# Altium PCB Kasli-DIOT.PCBDOC (part 11 of 23)
Units mm, origin at the board's own origin, x right, y up, seen from the top; angles counter-clockwise.
Board outline 222.9 x 100 mm, 10 copper layers (TopLayer, Layer 2, Layer 3, Layer 4, Layer 5, Layer 6, Layer 7, layer 8, Layer 9, BottomLayer), stack 1.564 mm thick; 977 components, 900 nets, 4676 pads, 2725 vias.
Unrouted connection lines stored in the file: 17.
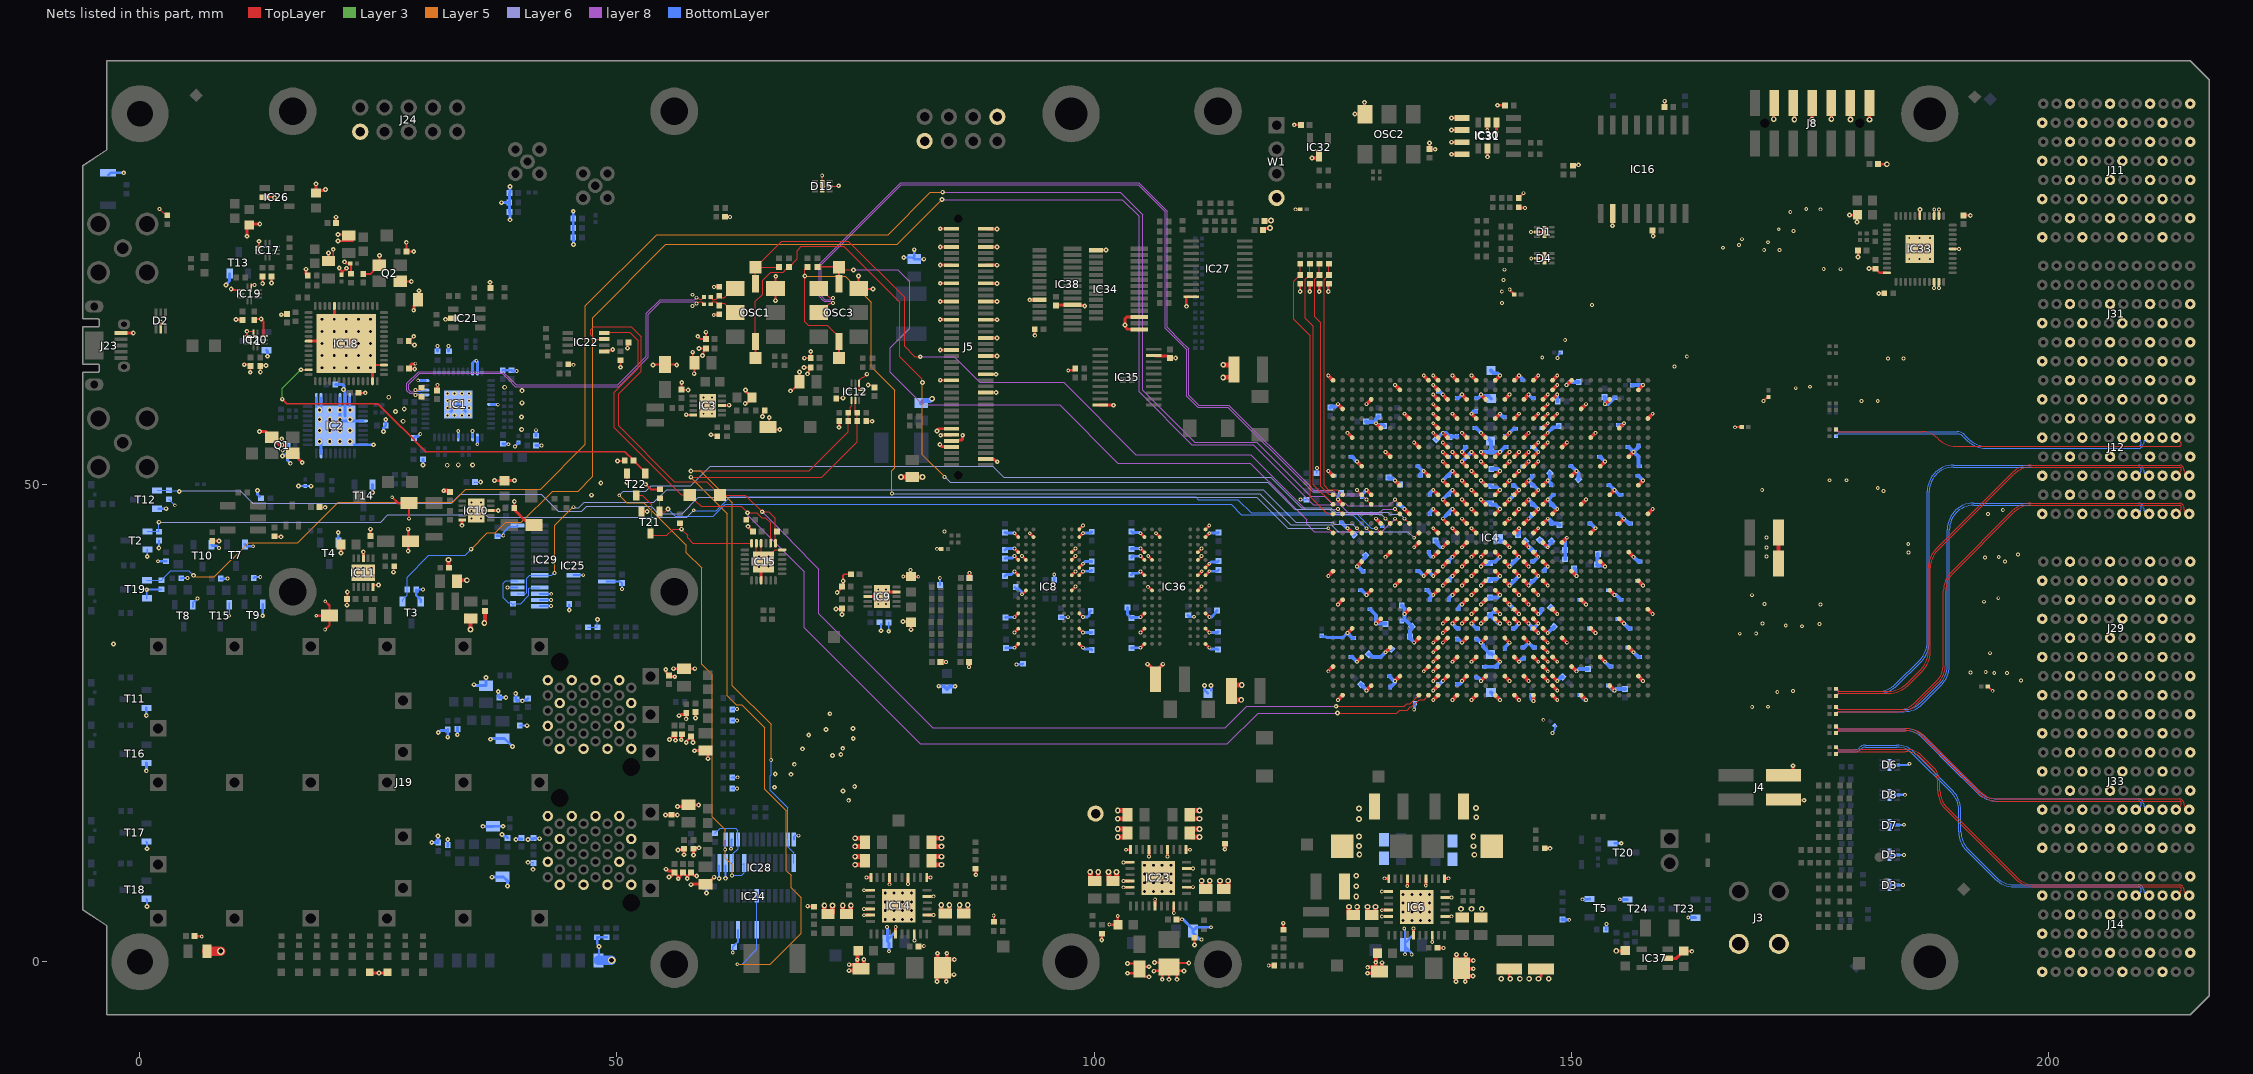
[diagram p17: the nets of this part, all layers, seen from the top]

## Via types
v1: diameter 0.4, hole 0.2, TopLayer to BottomLayer, tented both sides, 1723 vias
v2: diameter 0.5, hole 0.2, TopLayer to BottomLayer, tented both sides, 524 vias
v3: diameter 0.6, hole 0.3, TopLayer to BottomLayer, tented both sides, 172 vias
v4: diameter 0.6, hole 0.3, TopLayer to BottomLayer, 113 vias
v5: diameter 0.5, hole 0.2, TopLayer to BottomLayer, 107 vias
v6: diameter 0.4, hole 0.2, TopLayer to BottomLayer, 67 vias
v7: diameter 0.5, hole 0.25, TopLayer to BottomLayer, tented both sides, 12 vias
v8: diameter 0.8, hole 0.5, TopLayer to BottomLayer, tented both sides, 7 vias

## Nets (pads, with @x,y where several pads share a name; then routed paths per layer and width w, separated by ;. In a path a pad name is that pad's centre, name@x,y a point inside that pad or via, vN(x,y) a via of type N, cw(c..) or ccw(c..) an arc to the next point about the centre after c; other vN are vias at no path point) (continued)
GND: (continued)
  BottomLayer w0.25: R70.2@48.061,0.15 48.11,0.199 v2(48.11,1.591) 48.11,1.693 47.913,1.89 R223.1@47.913,2.585 R222.1@48.913,2.585 ; v1(132.523,3.486) 132.523,3.445 132.604,3.365 132.604,1.95 133.504,2.85 v1(133.504,3.485) ; v1(132.613,0.787) 132.613,1.766 C27.1@132.604,1.775 132.604,1.6 133.268,0.935 133.268,0.8 v1(133.297,0.771) ; T20.2@154.603,12.425 154.615,12.412 155.248,12.412 v2(155.261,12.425)
  BottomLayer w0.254: SW1.2@-3.348,82.427 -3.075,82.7 v5(-1.702,82.7) ; v1(1.9,41.988) 1.908,41.98 R308.2@2.747,41.98 2.76,41.967 R308.2@2.754,41.967 ; T12.2@1.982,47.498 v5(2.747,47.498) ; R306.2@4.342,40.204 4.372,40.235 v1(4.994,40.235) ; T10.2@7.504,43.7 7.571,43.633 8.036,43.633 v1(8.281,43.387) ; R310.2@8.456,40.175 v1(9.167,40.175) ; T7.2@11,43.756 T7.2@11.011,43.767 11.011,43.76 11.209,43.562 v1(11.866,43.562) ; R307.2@11.932,40.235 12.032,40.334 v1(12.613,40.334) ; v2(12.861,36.275) T9.2@12.861,37.463 ; v2(20.779,44.997) 20.794,44.982 T4.2@20.794,43.975 ; R45.1@28.944,39.003 R45.1@29.107,38.84 ; R45.1@28.944,39.023 28.944,38.429 29.24,38.133 29.251,38.133 29.424,37.96 T3.2@29.424,37.76 ; R256.2@37.416,44.675 37.444,44.647 38.058,44.647 v1(38.086,44.675) ; v2(80.061,73.824) 80.987,73.824 C423.1@81.161,73.65 ; v2(81.161,74.65) C423.1@81.161,73.65 ; v2(82.161,73.65) C423.1@81.161,73.65 ; v1(91.861,31.175) 91.888,31.202 92.509,31.202 R125.2@92.536,31.23 ; v1(95.833,40.59) 95.835,40.589 95.835,40.001 C471.1@95.836,40 ; R99.1@96.536,36.13 97.231,36.13 97.236,36.125 v1(97.286,36.125) v1@97.311,36.1 ; v5(111.577,28.959) 111.588,28.948 111.588,28.473 C50.1@111.936,28.125 ; C50.1@112.272,28.482 v5@112.272,28.957 ; C483.1@132.257,35.738 132.736,35.738 132.818,35.657 ; D3.7@183.386,8.05 D3.2@184.146,8.05 184.159,8.037 v1(184.784,8.037) ; D5.2@184.146,11.209 184.161,11.194 v1(184.919,11.194) ; D7.2@184.146,14.341 184.892,14.341 v1(184.914,14.363) ; D6.2@184.146,20.632 185.305,20.632 185.447,20.774 v1@185.458,20.774 ; D8.2@184.163,17.504 v1(184.999,17.504)
  BottomLayer w0.3: T16.2@0.661,20.85 0.669,20.842 v2(0.669,20.02) ; T11.2@0.661,26.6 0.663,26.598 v2(0.663,25.824) ; v2(9.011,70.95) 9.061,71 9.061,71.025 9.387,71.351 9.387,72.101 T13.2@9.411,72.125 ; v2(12.322,49.395) 12.322,48.99 R154.2@12.537,48.775 ; T1.2@13.251,64.112 13.363,64 v2(13.363,63.474) ; v2(14.936,53.025) 15.061,53.15 C23.1@15.461,53.15 ; C23.1@15.561,53.15 C23.1@15.461,53.15 ; v2(15.761,52.25) 15.752,52.25 15.461,52.541 C23.1@15.461,53.15 ; IC2.37@18.483,58.199 IC2.19@18.483,59.099 ; IC2.8@18.983,53.299 IC2.37@18.983,54.699 ; IC2.37@18.983,57.699 IC2.20@18.983,59.099 ; R17.1@20.481,60.525 21.248,60.525 21.383,60.39 21.383,60.047 v2(21.321,59.985) 21.483,59.823 IC2.25@21.483,59.099 IC2.37@21.483,57.199 ; IC2.24@20.983,59.099 20.983,56.699 IC2.31@23.383,56.699 ; IC2.37@21.983,57.699 IC2.26@21.983,59.099 ; IC2.37@22.483,54.199 IC2.36@23.383,54.199 v2(24.487,54.199) ; v5(24.38,49.197) 24.383,49.2 24.383,50.022 T14.2@24.386,50.025 ; v2(25.511,55.575) 25.511,55.951 C24.1@25.759,56.199 v2(25.759,56.848) ; C191.1@28.736,54.9 28.896,55.06 29.121,55.06 v1(29.386,55.325) ; v1(29.161,60.95) 29.188,60.95 29.21,60.928 IC1.22@29.911,60.928 ; v2(29.653,52.071) 29.657,52.075 29.657,52.676 R243.1@29.661,52.68 ; v2(30.586,12.5) C267.1@31.261,12.5 31.248,12.512 31.248,13.163 v2(31.236,13.175) ; v1(31.171,64.552) 31.178,64.545 31.178,64.028 R8.2@31.186,64.02 ; v2(31.261,24.05) 31.315,24.05 31.515,24.25 32.161,24.25 C178.1@32.261,24.35 v2(32.261,23.55) ; C266.1@32.261,12.15 C266.1@32.261,12.25 v2(32.261,12.825) ; R7.2@32.336,64.02 32.341,64.025 32.341,64.533 v1(32.346,64.538) ; IC1.45@32.611,57.678 v5(32.98,58.047) IC1.45@33.361,58.428 v5(33.742,58.047) IC1.45@34.111,57.678 ; v2(33.261,23.8) 33.274,23.813 C185.1@33.274,24.588 ; IC1.6@33.361,54.978 v1(33.361,55.65) ; IC1.3@34.861,54.978 v1(34.861,55.65) ; IC1.31@34.861,61.878 34.861,62.779 35.068,62.986 35.236,62.986 v1(35.255,63.005) 35.361,62.899 IC1.32@35.361,61.878 ; v2(35.011,29.05) 35.065,29.05 35.165,28.95 C179.1@36.261,28.95 v2(36.261,29.8) ; v1(35.361,54.25) IC1.2@35.361,54.978 ; v2(35.936,14.2) C268.1@37.011,14.2 37.019,14.208 v2(38.043,14.208) ; v2(36.736,23.325) 36.79,23.325 36.865,23.4 C184.1@38.011,23.4 38.211,23.4 v2(39.036,22.575) ; IC1.39@36.811,58.428 37.451,58.428 37.48,58.4 v1(37.507,58.4) ; v2(36.911,8.875) 37.986,8.875 C272.1@38.011,8.9 38.111,8.9 38.511,8.5 v2(38.511,7.95) ; v2(37.549,28.343) 37.587,28.304 37.587,27.774 37.663,27.698 38.347,27.698 v2(38.349,27.696) ; v2(37.886,79.575) R30.1@38.716,79.575 ; v2(37.943,13.333) 37.997,13.333 38.17,13.16 38.351,13.16 C269.1@38.511,13 ; C243.1@38.021,62.012 38.027,62.006 38.955,62.006 39.017,61.944 39.467,61.944 v1(39.486,61.925) ; C190.1@38.036,54.3 38.067,54.269 38.592,54.269 v1(38.611,54.25) ; v2(38.786,77.775) 38.786,78.524 C46.1@38.736,78.574 C47.1@38.736,80.575 38.786,80.625 v2(38.786,81.275) ; v1(39.311,54) 39.311,54.025 39.686,54.4 C242.1@39.686,54.425 ; v2(39.382,28.139) 39.42,28.1 39.42,27.459 39.487,27.392 40.038,27.392 v2(40.077,27.354) 40.115,27.392 40.221,27.392 40.269,27.44 40.526,27.44 C181.1@40.686,27.6 ; v2(39.393,12.833) 39.447,12.833 39.488,12.874 39.985,12.874 C270.1@40.011,12.9 ; v2(40.668,12.833) 40.701,12.867 41.228,12.867 41.307,12.946 41.842,12.946 v2(41.881,12.907) ; C241.1@41.496,54.142 41.504,54.133 42.078,54.133 v1(42.086,54.125) ; C239.1@41.496,55.142 41.503,55.149 41.503,55.718 v1(41.511,55.725) ; v2@44.993,37.08 v2@44.995,37.082 ; v2@44.995,36.882 C305.1@44.995,37.414 ; v2(45.411,78.675) C44.1@45.411,77.925 C43.1@45.411,75.924 45.423,75.912 45.423,75.213 v2(45.436,75.2) ; v1(78.31,3.666) 78.31,3.638 78.348,3.6 C22.1@78.348,2.128 ; v1(78.523,1.108) 78.523,1.953 C22.1@78.348,2.128 ; v1(79.211,3.65) 79.192,3.631 79.192,3.146 78.348,2.303 C22.1@78.348,2.128 ; C462.1@90.685,42.273 90.732,42.32 91.445,42.32 91.647,42.522 v1(91.661,42.522) ; C467.1@90.685,43.181 90.817,43.313 91.651,43.313 v1(91.661,43.322) ; C460.1@90.685,45.015 90.769,44.932 91.651,44.932 v1(91.661,44.922) ; C164.1@90.686,40.45 90.846,40.61 91.335,40.61 91.647,40.922 v1(91.661,40.922) ; C454.1@90.736,36.075 90.776,36.115 91.654,36.115 v1(91.664,36.125) ; C452.1@90.761,32.875 90.801,32.915 91.654,32.915 v1(91.664,32.925) ; C466.1@91.711,39.225 91.871,39.065 92.122,39.065 92.454,38.733 92.454,38.548 v1@92.464,38.538 ; v1(98.858,40.925) 98.868,40.935 99.646,40.935 C465.1@99.761,41.05 ; v1(98.858,41.725) 99.083,41.95 C456.1@99.761,41.95 ; v1(98.858,44.925) 98.868,44.935 99.621,44.935 C171.1@99.761,45.075 ; v1(98.861,32.928) 98.875,32.928 99.001,32.801 99.66,32.801 C455.1@99.761,32.7 ; v1(98.861,34.528) 98.871,34.537 99.748,34.537 C453.1@99.761,34.55 ; v1(98.861,36.128) 98.871,36.137 99.325,36.137 99.501,36.313 99.501,36.615 C169.1@99.661,36.775 ; C469.1@103.511,37.15 103.511,36.425 C457.1@103.911,36.025 103.993,36.107 104.857,36.107 104.875,36.125 v1(104.889,36.125) ; C166.1@103.915,40.575 104.065,40.725 104.675,40.725 104.872,40.922 v1(104.886,40.922) ; C463.1@103.915,42.385 104.043,42.513 104.876,42.513 v1(104.886,42.522) ; C470.1@103.915,43.282 103.946,43.313 104.876,43.313 v1(104.886,43.322) ; C461.1@103.915,45.111 104.026,45 104.794,45 104.872,44.922 v1(104.886,44.922) ; C459.1@103.936,32.875 103.976,32.915 104.879,32.915 v1(104.889,32.925) ; v1(109.23,4.453) 109.25,4.434 109.356,4.434 110.39,3.4 C40.1@110.39,3.225 ; R100.1@109.861,36.305 110.001,36.165 v1(110.496,36.165) ; v1(111.261,2.351) 111.242,2.37 111.07,2.37 110.39,3.05 C40.1@110.39,3.225 ; v1(112.077,40.94) 112.083,40.935 112.896,40.935 C464.1@113.036,41.075 ; v1(112.083,41.725) 112.097,41.725 112.276,41.904 112.915,41.904 C458.1@113.036,42.025 ; v1(112.083,44.925) 112.093,44.935 112.971,44.935 C170.1@113.036,45 ; v1(112.086,32.928) 112.1,32.928 112.226,32.801 112.936,32.801 C468.1@112.986,32.751 ; v1(112.086,34.528) 112.096,34.537 112.926,34.537 C451.1@112.986,34.598 ; v1(112.086,36.128) 112.096,36.137 112.335,36.137 112.751,36.553 112.751,36.665 C165.1@112.911,36.825 ; v1@112.245,3.625 110.765,3.625 110.39,3.25 C40.1@110.39,3.225 ; C484.1@123.861,34.175 123.861,34.15 123.936,34.075 124.3,34.075 124.375,34 126.092,34 126.542,34.45 v1(126.561,34.45) ; v1(125.561,48.45) 125.561,48.8 125.891,49.13 R9.1@125.891,49.15 ; v1(133.561,26.45) 133.611,26.5 133.611,27.05 C317.1@133.661,27.1 ; v1(151.211,6.55) 151.586,6.55 T5.2@151.961,6.575 ; R261.1@153.656,3.375 153.692,3.411 153.692,3.931 v1(153.711,3.95) ; v1(155.111,6.55) 155.536,6.55 T24.2@155.911,6.525 ; v1(162.284,4.634) 162.288,4.629 163.057,4.629 T23.2@163.061,4.625
  BottomLayer w0.4: v2(83.729,28.892) 83.746,28.875 84.305,28.875 C173.1@84.58,28.6 84.844,28.864 85.43,28.864 v2(85.449,28.883) ; C474.1@83.927,31.431 83.933,31.425 v1(84.486,31.425) ; v1(86.911,30.9) 86.911,31.437 C478.1@86.915,31.441 ; C476.1@86.936,40.227 v1(86.936,40.775) ; v1(124.561,51.45) 125.061,50.95 C310.1@125.186,50.95 ; C31.1@124.761,58.1 124.871,58.21 125.321,58.21 v1(125.561,58.45) ; C309.1@125.911,46.05 125.936,46.05 126.536,45.45 v1(126.561,45.45) C92.1@127.243,44.768 ; v1(126.561,34.45) 127.061,33.95 C155.1@127.211,33.95 ; C318.1@126.911,31.95 127.061,31.95 v1(127.561,31.45) ; C82.1@126.911,52.95 127.032,52.95 127.532,52.45 v1(127.561,52.45) ; v1(127.557,41.453) 127.667,41.453 128.192,40.928 C482.1@128.217,40.928 ; v1@127.561,41.45 128.036,41.925 128.036,42.006 128.468,42.438 C163.1@128.468,42.593 ; C156.1@127.911,38.95 128.061,38.95 v1(128.561,38.45) ; C96.1@127.979,29.082 128.561,28.5 v1(128.561,28.45) ; C80.1@128.061,48.775 128.061,48.95 v1(128.561,49.45) ; C37.1@128.511,56.65 128.571,56.59 129.421,56.59 v1(129.561,56.45) ; C168.1@128.779,32.232 128.935,32.232 129.217,31.95 130.061,31.95 130.793,32.682 130.901,32.682 131.012,32.793 C109.1@131.168,32.793 ; C154.1@128.911,36.95 128.936,36.95 129.561,36.325 v1(129.561,35.45) 130.537,35.45 C481.1@130.561,35.426 ; v1(129.561,46.45) 130.186,45.825 130.186,45.65 C62.1@130.211,45.65 ; C79.1@129.836,57.175 129.561,56.9 v1(129.561,56.45) ; C39.1@130.411,56.15 130.301,56.26 129.751,56.26 v1(129.561,56.45) ; C35.1@130.873,50.775 130.983,50.665 131.346,50.665 v1(131.561,50.45) 131.849,50.162 131.983,50.162 C57.1@132.093,50.052 ; C316.1@130.911,29.925 130.986,29.925 131.461,29.45 v1(131.561,29.45) 131.561,29.25 131.086,28.775 131.061,28.775 C315.1@131.061,28.75 ; C68.1@131.911,47.95 132.031,47.95 132.531,47.45 v1(132.561,47.45) ; C480.1@132.264,37.361 132.264,37.351 132.561,37.054 v1(132.561,36.45) 132.561,35.914 132.736,35.738 ; 132.818,35.657 C86.1@133.343,35.132 133.343,34.976 133.111,34.744 133.111,33.925 133.561,33.475 v1(133.561,33.45) ; C153.1@133.911,40.95 134.061,40.95 v1(134.561,40.45) ; C138.1@133.911,51.95 133.936,51.95 134.417,51.469 134.542,51.469 v1(134.561,51.45) ; C125.1@134.211,50.95 C125.1@134.236,50.95 134.236,51.162 134.362,51.289 ; C485.1@134.869,38.965 134.894,38.965 135.409,38.45 v1@135.515,38.45 ; C118.1@135.111,42.95 135.136,42.95 135.136,42.684 135.37,42.45 v1(135.561,42.45) ; C98.1@135.211,37.971 135.211,38.146 v1@135.515,38.45 ; C119.1@135.211,40.95 135.236,40.95 135.236,40.775 v1(135.561,40.45) ; C117.1@135.211,46.95 135.236,46.95 135.236,47.117 135.25,47.131 135.25,47.164 135.536,47.45 v1(135.561,47.45) ; C55.1@135.211,48.95 135.236,48.95 135.236,49.125 v1(135.561,49.45) ; v1(135.561,28.45) v1(136.561,29.45) ; v1(135.561,38.45) v1@135.515,38.45 ; v1(135.561,60.45) 136.061,59.95 C334.1@136.061,59.8 ; v1(135.561,60.45) v1(136.561,59.45) ; C357.1@135.811,44.15 135.921,44.04 135.921,43.837 136.308,43.45 v1(136.561,43.45) ; C93.1@135.879,54.768 v1(136.561,55.45) 136.886,55.45 137.311,55.025 137.361,55.075 138.061,55.075 C344.1@138.061,55.1 ; v1(136.561,39.45) v1(137.561,40.45) ; v1(136.561,41.45) C377.1@137.086,41.975 ; v1(136.561,46.45) 137.049,46.938 137.049,46.962 137.537,47.45 v1(137.561,47.45) ; v1(136.561,48.45) v1(137.561,49.45) ; v1(136.561,50.45) v1(137.561,51.45) ; v1(136.561,53.45) 137.073,52.938 C373.1@137.211,52.938 ; C379.1@137.211,37.962 137.211,38.137 137.524,38.45 v1(137.561,38.45) ; C377.1@137.211,41.975 C377.1@137.086,41.975 ; v1(137.561,35.45) 138.061,34.95 C330.1@138.211,34.95 ; v1(137.561,42.45) 137.537,42.45 137.386,42.299 137.386,42.275 C377.1@137.086,41.975 ; C114.1@138.061,29.1 138.061,29.125 138.327,29.125 138.561,29.359 v1(138.561,29.45) ; C331.1@138.061,33.8 138.061,33.775 138.236,33.775 138.386,33.625 v1(138.561,33.45) ; C333.1@138.061,59.1 138.061,59.125 138.236,59.125 v1(138.561,59.45) ; C102.1@138.211,36.95 138.236,36.95 138.236,37.216 138.47,37.45 v1(138.561,37.45) ; v1(138.561,52.45) v1(139.561,53.45) ; v1(138.561,53.45) 138.886,53.775 138.886,53.95 C340.1@138.911,53.95 ; v1(138.561,55.45) 138.586,55.45 139.086,54.95 C345.1@139.111,54.95 ; v1(139.561,35.45) 140.061,34.95 C327.1@140.211,34.95 ; v1(139.561,57.45) 139.786,57.675 140.061,57.675 C337.1@140.061,57.7 ; C350.1@139.911,55.95 140.061,55.95 v1(140.561,55.45) 141.136,54.875 141.286,54.875 C332.1@141.561,54.6 141.598,54.563 141.598,53.538 C361.1@141.636,53.5 ; C115.1@140.061,29.8 140.061,29.775 140.327,29.775 140.561,29.541 v1(140.561,29.45) ; C336.1@140.061,59.1 140.061,59.125 140.315,59.125 140.561,59.371 v1(140.561,59.45) 140.711,59.3 141.361,59.3 C319.1@141.636,59.025 ; C322.1@140.088,33.8 140.088,33.775 140.263,33.775 v1@140.574,33.463 ; v1(140.561,33.45) 140.762,33.249 140.762,33.021 141.288,32.496 141.288,32.475 141.439,32.324 141.687,32.324 v1(142.561,31.45) 142.236,31.125 142.236,30.95 C329.1@142.211,30.95 142.186,30.95 142.161,30.925 C112.1@140.911,30.925 ; v1(140.561,35.45) 140.611,35.45 C111.1@141.511,36.35 ; v1(140.561,37.45) 141.176,38.065 141.401,38.065 C110.1@141.511,38.175 142.286,38.175 v1(142.561,38.45) ; v1(140.561,39.45) 141.001,39.89 141.401,39.89 C134.1@141.511,40 141.621,40.11 142.221,40.11 v1(142.561,40.45) ; v1(140.561,41.45) 140.826,41.715 141.401,41.715 C352.1@141.511,41.825 141.621,41.935 142.046,41.935 v1(142.561,42.45) ; v1(140.561,48.45) 140.876,48.135 141.526,48.135 C356.1@141.636,48.025 141.746,47.915 142.096,47.915 v1(142.561,47.45) ; v1(140.561,50.45) 141.051,49.96 141.526,49.96 C135.1@141.636,49.85 141.746,49.74 142.271,49.74 v1(142.561,49.45) ; v1(140.561,53.45) v1(142.561,53.45) 143.061,53.95 C341.1@143.211,53.95 ; C321.1@141.611,61.975 141.886,61.7 142.311,61.7 v1(142.561,61.45) ; C101.1@141.613,28.25 141.888,27.975 142.036,27.975 v1(142.561,27.45) ; C355.1@141.636,51.65 142.361,51.65 v1(142.561,51.45) ; L5.1@142.361,44.35 142.661,44.05 142.961,44.05 v1(143.561,43.45) ; v1(142.561,35.45) 142.411,35.45 C111.1@141.511,36.35 ; v1(142.561,36.45) 142.364,36.647 141.952,36.647 141.945,36.64 141.801,36.64 C111.1@141.511,36.35 ; v1(142.561,57.45) 142.886,57.125 143.061,57.125 C335.1@143.061,57.1 ; C324.1@143.061,32.8 143.061,32.95 v1(143.561,33.45) ; C349.1@143.061,55.125 143.235,55.125 v1@143.474,55.364 ; v1(143.561,37.45) v1(144.561,36.45) 144.061,36.95 C106.1@143.911,36.95 ; v1(143.561,39.45) v1(144.561,40.45) ; v1(143.561,41.45) v1(144.561,42.45) ; v1(143.561,48.45) v1(144.561,49.45) 144.261,49.75 144.086,49.925 C376.1@143.911,49.925 ; v1@143.665,55.554 143.992,55.881 C343.1@144.208,55.881 ; C326.1@143.911,34.95 144.061,34.95 v1(144.561,35.45) ; C143.1@144.436,44.75 144.546,44.86 144.546,45.435 v1(144.561,45.45) ; v1(144.561,31.45) 144.561,31.453 144.795,31.687 144.827,31.687 144.915,31.775 145.061,31.775 C97.1@145.061,31.8 ; v1(144.561,61.45) 144.886,61.125 144.886,60.95 C348.1@144.911,60.95 ; C323.1@144.911,32.95 145.061,32.95 v1(145.561,33.45) 146.061,32.95 C113.1@146.211,32.95 ; C375.1@144.911,51.925 145.036,51.925 v1(145.561,52.45) ; C145.1@145.218,44.107 145.218,43.951 145.561,43.608 v1(145.561,43.45) ; v1(145.561,35.45) C325.1@146.061,34.95 ; v1(145.561,39.45) v1(146.561,40.45) ; v1(145.561,46.45) 145.585,46.45 145.736,46.601 145.736,46.625 v1(146.561,47.45) ; v1(145.561,48.45) 145.585,48.45 145.761,48.274 145.761,48.25 v1(146.561,47.45) ; v1(145.561,59.45) 145.886,59.125 146.061,59.125 C347.1@146.061,59.1 ; C328.1@145.861,27.95 145.861,27.55 v1(146.061,27.35) ; C325.1@145.911,34.95 C325.1@146.061,34.95 ; C122.1@145.911,41.95 146.061,41.95 v1(146.561,42.45) v1(145.561,43.45) ; C342.1@145.911,53.95 146.061,53.95 v1(146.561,53.45) ; C99.1@145.936,47.95 146.061,47.95 146.286,47.725 v1(146.561,47.45) ; C354.1@145.936,50.95 145.911,50.95 145.911,50.776 145.585,50.45 v1(145.561,50.45) v1(146.561,49.45) ; C369.1@146.186,42.975 146.161,42.975 145.686,43.45 v1(145.561,43.45) ; v1(146.561,34.45) C325.1@146.061,34.95 ; v1(146.561,35.45) C325.1@146.061,34.95 ; v1(146.561,36.45) 146.652,36.45 146.886,36.684 146.886,36.925 C380.1@146.911,36.925 ; C152.1@146.718,44.232 147.5,43.45 v1(147.561,43.45) 147.561,43.544 147.968,43.951 C151.1@147.968,44.107 ; C338.1@146.911,55.95 147.061,55.95 v1(147.561,56.45) ; C368.1@147.211,40.95 147.236,40.95 147.236,41.125 v1(147.561,41.45) ; v1(147.561,34.45) 148.213,35.102 C66.1@148.213,35.117 ; v1(147.561,46.45) 147.736,46.275 147.736,46.386 C370.1@148.05,46.072 ; v1(147.561,55.45) 148.151,56.04 148.601,56.04 C58.1@148.711,56.15 ; C124.1@147.779,51.232 147.779,50.668 v1(147.561,50.45) 147.736,50.275 147.886,50.125 147.886,49.95 C372.1@147.911,49.95 ; C123.1@147.879,37.132 v1(148.561,36.45) ; C370.1@147.911,45.95 148.611,45.95 C314.1@148.786,45.775 ; C371.1@147.911,47.95 147.936,47.95 148.436,47.45 v1(148.561,47.45) v1(147.561,48.45) 147.636,48.45 148.136,48.95 C148.1@148.161,48.95 ; v1(148.561,29.45) 148.974,29.863 C94.1@149.124,29.863 ; v1(148.561,59.45) 148.561,58.8 C85.1@148.611,58.75 ; R32.1@149.111,4.435 149.146,4.4 v1(149.811,4.4) ; C158.1@149.386,42.2 C313.1@149.386,43.175 149.386,44.275 v1(149.561,44.45) ; v1(149.511,60.475) 149.819,60.783 C429.1@150.811,60.783 ; C311.1@149.961,51.95 150.061,51.95 v1(150.561,51.45) 150.779,51.232 C67.1@150.779,50.568 ; C240.1@150.36,41.221 150.47,41.111 150.47,40.541 v1(150.561,40.45) ; v1(150.561,30.45) 150.811,30.7 C34.1@151.761,30.7 ; C432.1@150.911,27.975 150.936,27.975 151.461,27.45 v1(151.561,27.45) ; C76.1@150.911,37.95 151.061,37.95 v1(151.561,37.45) ; C140.1@151.899,34.95 152.061,34.95 v1(152.561,34.45) ; C127.1@151.961,45.95 152.061,45.95 v1(152.561,45.45) ; C78.1@152.811,42.75 152.761,42.7 152.761,41.675 C59.1@152.711,41.625 152.821,41.515 153.496,41.515 v1(153.561,41.45) ; C64.1@152.961,52.95 153.036,52.95 153.536,52.45 v1(153.561,52.45) ; C428.1@153.496,59.192 153.561,59.127 v1(153.561,58.45) 153.887,58.45 154.575,59.138 C433.1@154.6,59.138 ; v1(153.561,31.45) 154.061,30.95 C60.1@154.211,30.95 ; C147.1@153.911,28.95 153.936,28.95 154.436,28.45 v1(154.561,28.45) 154.711,28.6 C33.1@155.661,28.6 ; C83.1@153.911,38.95 154.061,38.95 v1(154.561,38.45) 154.736,38.45 155.236,37.95 C128.1@155.261,37.95 ; C89.1@153.961,49.95 154.061,49.95 v1(154.561,49.45) 155.061,48.95 C87.1@155.261,48.95 ; C308.1@154.911,35.937 155.074,35.937 v1(155.561,35.45) 156.061,34.95 C139.1@156.196,34.95 ; C69.1@154.911,46.95 155.061,46.95 v1(155.561,46.45) 156.061,45.95 C88.1@156.261,45.95 ; C431.1@154.967,56.26 154.992,56.285 155.396,56.285 v1(155.561,56.45) ; C146.1@155.911,32.95 156.061,32.95 v1(156.561,32.45) 157.061,31.95 C61.1@157.211,31.95 ; C90.1@155.961,53.95 156.057,53.95 v1@156.557,53.45 ; C430.1@156.411,60.45 v1(157.561,60.45) ; v1(156.561,42.45) 157.061,41.95 C136.1@157.261,41.95 ; C126.1@156.923,39.95 157.061,39.95 v1(157.561,39.45) ; C149.1@156.961,50.95 157.061,50.95 v1(157.561,50.45) ; C81.1@157.061,54.1 157.061,53.95 v1(156.561,53.45) 157.061,52.95 157.061,52.075 157.186,51.95 C75.1@157.211,51.95
  BottomLayer w0.5: C425.1@81.886,58.55 82.161,58.825 82.809,58.825 83.009,59.025 v4(83.036,59.025)
  BottomLayer w1: R70.2@48.061,0.15 v8@49.405,0.15
  other v1: 112.272,3.625 185.472,20.759 147.097,25.368 168.989,26.72 170.635,26.735 171.623,28.291 173.261,28.375 197.161,29.5 194.361,30.275 195.686,30.275 191.881,30.311 193.464,30.369 193.911,32.35 167.69,34.395 169.411,34.4 174.212,35.177 172.512,35.237 176.036,35.425 170.086,35.45 176.136,37.45 170.286,37.5 193.302,37.747 194.789,38.117 168.956,38.43 195.498,41.958 193.395,42.366 194.835,42.436 170.486,42.49 196.841,42.707 185.384,42.896 170.486,43.427 185.348,43.8 170.486,44.49 193.713,46.925 195.261,47.362 182.761,49.337 170.036,49.45 182.155,49.657 177.086,50.475 178.86,50.48 14.969,53.575 180.441,58.774 182.149,58.774 173.556,60.13 175.061,60.275 160.836,62.4 183.223,63.241 184.861,63.25 146.987,63.339 162.136,63.45 149.386,65.175 57.909,68.749 152.211,68.85 142.777,69.044 57.909,69.921 142.746,70.262 142.936,71.475 143.036,72.55 178.261,72.6 176.486,72.625 170.246,74.619 171.844,74.615 165.936,74.85 167.611,75.125 170.636,75.424 167.926,75.744 173.311,76.6 171.779,76.785 172.986,78.6 176.161,78.875 174.655,78.902
  other v2: 137.936,-2.075 138.911,-2.075 74.286,16.925 73.7,17.906 66.499,18.298 74.912,18.384 68.25,19.652 66.586,19.7 68.586,20.7 72.596,21.619 73.461,21.725 69.436,22.325 73.661,22.375 74.76,23.411 70.098,23.787 71.897,24.345 74.749,24.456 72.311,26 -2.789,33.325 44.993,36.88 47.325,48.913 48.304,50.176 14.894,54.167 49.557,64.18 109.687,68.704 150.786,83.54
  other v3: 142.686,-1.775 143.636,-1.775 144.636,-1.775 145.611,-1.775 147.661,-1.775 138.461,5.55 139.561,5.55 140.636,5.55 127.492,6.842 127.492,7.917 127.492,9.017 139.866,11.226 127.811,11.25 139.79,12.125 127.786,12.15 127.786,13.125 139.765,13.125 127.786,14.971 140.061,15.149 127.786,16.071 140.036,16.124
  other v4: 132.399,4.317 133.315,4.317 134.232,4.317 135.149,4.317 78.111,4.45 79.028,4.45 79.944,4.45 80.861,4.45 132.399,5.234 133.315,5.234 134.232,5.234 135.149,5.234 78.111,5.367 79.028,5.367 79.944,5.367 80.861,5.367 132.399,6.15 133.315,6.15 134.232,6.15 135.149,6.15 78.111,6.283 79.028,6.283 79.944,6.283 80.861,6.283 132.399,7.067 133.315,7.067 134.232,7.067 135.149,7.067 78.111,7.2 79.028,7.2 79.944,7.2 80.861,7.2 105.311,7.375 106.228,7.375 107.144,7.375 108.061,7.375 105.311,8.292 106.228,8.292 107.144,8.292 108.061,8.292 105.311,9.208 106.228,9.208 107.144,9.208 108.061,9.208 105.311,10.125 106.228,10.125 107.144,10.125 108.061,10.125 18.832,54.548 19.89,54.548 20.949,54.548 22.007,54.548 18.832,55.691 19.89,55.691 20.949,55.691 22.007,55.691 18.832,56.834 19.89,56.834 20.949,56.834 22.007,56.834 18.832,57.85 19.89,57.85 20.949,57.85 22.007,57.85 19.086,62.268 20.356,62.268 21.626,62.268 22.896,62.268 24.166,62.268 19.086,63.538 20.356,63.538 21.626,63.538 22.896,63.538 24.166,63.538 19.086,64.808 20.356,64.808 21.626,64.808 22.896,64.808 24.166,64.808 19.086,66.078 20.356,66.078 21.626,66.078 22.896,66.078 24.166,66.078 19.086,67.348 20.356,67.348 21.626,67.348 22.896,67.348 24.166,67.348
  other v5: 112.261,28.968 77.38,37.525 78.205,37.525 78.18,38.275 77.38,39.025 78.18,39.025 22.561,40.375 23.361,40.375 24.261,40.375 22.561,41.275 23.361,41.275 24.261,41.275 64.905,41.403 65.88,41.428 64.905,42.503 65.88,42.503 34.761,46.45 35.761,46.45 34.761,47.25 35.761,47.25 34.761,48.15 35.761,48.15 32.218,57.285 32.98,57.285 33.742,57.285 34.504,57.285 59.061,57.45 59.961,57.45 32.218,58.047 34.504,58.047 59.061,58.35 59.961,58.35 32.218,58.809 32.98,58.809 33.742,58.809 34.504,58.809 59.061,59.15 59.961,59.15 32.218,59.571 32.98,59.571 33.742,59.571 34.504,59.571
  other v6: 84.332,45.119 185.449,73.662 186.549,73.662 187.649,73.662 186.549,74.737 185.449,74.762 187.649,74.762 185.449,75.862 186.549,75.862 187.649,75.862
  other v7: 32.218,52.051 33.349,52.083 34.861,52.071 40.003,55.796 27.579,56.653 39.992,57.102 26.787,57.682 27.712,57.947 40.043,58.589 26.085,59.169 40.043,59.875 38.218,60.236
  other v8: 49.431,0.176
GPIO_INT0: IC4.U4 IC25.20 IC29.1 | length 98.8
  TopLayer w0.095: v1(127.561,45.45) IC4.U4@128.061,44.95
  Layer 5 w0.125: v1(43.461,40.75) 43.461,45.75 45.256,47.545 45.259,47.545 45.369,47.655 v1(45.444,47.655)
  Layer 6 w0.095: v1(45.444,47.655) 45.499,47.6 45.986,47.6 46.549,48.163 53.85,48.163 55.192,49.505 117.719,49.505 121.074,46.15 121.151,46.073 125.009,46.073 125.205,45.877 127.134,45.877 v1(127.561,45.45)
  BottomLayer w0.125: IC29.1@39.558,38.575 40.404,38.575 40.537,38.707 40.537,40.226 40.836,40.525 IC25.20@41.908,40.525 43.162,40.525 43.387,40.75 v1(43.461,40.75)
GPIO_INT1: IC4.T9 IC24.20 IC28.1 | length 136
  TopLayer w0.095: v1(132.561,46.45) IC4.T9@133.061,45.95
  Layer 5 w0.1: v1(50.236,48.9) 51.032,48.104 52.823,48.104 57.253,43.674 57.253,42.9 58.861,41.293 58.861,31.167 59.961,30.067 59.961,15.225 61.341,13.845 v1(61.341,11.779) 61.341,10.87 62.061,10.15 v1(62.061,9.05)
  Layer 6 w0.095: v1(50.236,48.9) 50.676,49.34 53.034,49.34 53.599,49.906 57.742,49.906 59.761,51.925 89.411,51.925 90.536,50.8 118.536,50.8 121.72,47.616 124.839,47.616 125.353,47.103 130.835,47.103 131.03,46.908 132.103,46.908 v1(132.561,46.45)
  BottomLayer w0.1: v1(62.061,9.05) 63.061,9.05 63.336,9.325 IC24.20@63.336,10.35 IC24.20@63.2,10.214
  BottomLayer w0.125: IC28.1@61.341,12.78 IC28.1@61.386,12.825
  BottomLayer w0.2: v1(61.341,11.779) IC28.1@61.341,12.78
GPIO_RESET0: IC25.18 IC29.3 R132.2 | length 8.4
  BottomLayer w0.125: R132.2@39.106,37.386 38.878,37.614 38.619,37.614 38.081,38.152 38.081,39.666 38.346,39.931 39.502,39.931 IC29.3@39.558,39.875 ; R132.2@39.116,37.55 39.899,37.55 40.762,38.413 40.762,39.131 40.835,39.205 41.887,39.205 IC25.18@41.908,39.225
GPIO_RESET1: IC24.18 IC28.3 R131.2 | length 6.4
  BottomLayer w0.1: IC24.18@62.036,10.35 62.177,10.491 62.177,11.366 62.686,11.875 IC28.3@62.686,12.825
  BottomLayer w0.125: R131.2@60.263,13.499 60.491,13.726 60.571,13.726 60.833,13.988 62.438,13.988 62.671,13.754 62.671,12.84 IC28.3@62.686,12.825
Helper_DCXO_N: IC4.N4 OSC3.5 | length 91.9
  TopLayer w0.095: OSC3.5@71.161,68.05 71.361,68.05 72.323,69.012 72.578,69.012 v1(72.636,69.07) ; v1(127.561,49.45) IC4.N4@128.061,48.95
  layer 8 w0.075: v1(72.636,69.07) 72.579,69.07 72.43,69.219 71.706,69.219 71.593,69.332 71.184,69.741 71.184,73.134 79.722,81.672 104.707,81.672 107.686,78.693 107.686,66.5 109.061,65.125 109.929,64.257 109.929,59.38 110.954,58.355 114.121,58.355 122.386,50.09 123.022,49.454 124.964,49.454 125.166,49.252 125.354,49.064 127.797,49.064 127.841,49.108 127.841,49.17 v1(127.561,49.45)
Helper_DCXO_OE: IC12.9 IC24.7 IC28.19 R245.1 R247.2 | length 92.6
  TopLayer w0.125: v2(57.736,50.799) 71.478,50.799 75.166,54.488 R247.2@75.166,56.675 R245.1@75.166,57.55 ; R245.1@74.986,57.55 IC12.9@74.986,58.85
  Layer 5 w0.125: v2(57.736,50.799) 61.561,46.974 61.561,27.876 62.485,26.952 63.059,26.952 65.495,24.516 65.495,18.083 67.761,15.817 67.761,9.566 68.261,9.066 68.261,7.762 69.289,6.733 69.289,2.989 66.041,-0.259 v1(62.611,-0.259)
  BottomLayer w0.125: v1(62.611,-0.259) 62.639,-0.23 63.113,-0.23 64.636,1.293 IC24.7@64.636,3.35 IC28.19@64.636,6.925
Helper_DCXO_P: IC4.P5 OSC3.4 | length 91.6
  TopLayer w0.095: OSC3.4@71.161,70.59 71.361,70.59 72.323,69.628 72.578,69.628 v1(72.636,69.57) ; v1(128.561,48.45) IC4.P5@129.061,47.95
  layer 8 w0.075: v1(72.636,69.57) 72.579,69.57 72.43,69.421 71.79,69.421 71.386,69.825 71.386,73.05 79.806,81.47 104.624,81.47 107.484,78.609 107.484,66.416 108.847,65.054 109.727,64.174 109.727,59.297 110.87,58.153 114.037,58.153 122.172,50.019 122.939,49.252 124.88,49.252 125.27,48.862 128.149,48.862 v1(128.561,48.45)
Helper_DCXO_SCL: IC4.T8 OSC3.8 R50.1 TP24.1 | length 84
  TopLayer w0.095: v1(131.561,46.45) IC4.T8@132.061,45.95
  TopLayer w0.1: TP24.1@73.261,72.8 73.536,72.525 v2(74.786,72.525)
  TopLayer w0.2: R50.1@71.011,72.83 71.036,72.855 73.206,72.855 TP24.1@73.261,72.8 OSC3.8@73.261,71.075 OSC3.8@73.261,70.877
  layer 8 w0.095: v2(74.786,72.525) 79.436,72.525 80.661,71.3 80.661,66.4 78.636,64.375 78.636,61.775 82.036,58.375 96.386,58.375 102.498,52.263 116.398,52.263 120.136,48.525 120.136,48.5 122.286,46.35 122.286,45.895 123.106,45.076 130.186,45.076 v1(131.561,46.45)
Helper_DCXO_SDA: IC4.U10 OSC3.7 R41.1 TP23.1 | length 99.1
  TopLayer w0.1: v5(69.686,71.875) 69.686,67.075 70.036,66.725 72.042,66.725 72.477,66.29 72.892,65.875 72.936,65.875 73.261,65.55 OSC3.7@73.261,65.172 ; v5@69.701,71.875 69.701,72.59 69.941,72.83 R41.1@69.961,72.83 R41.1@69.981,72.83
  TopLayer w0.127: v1(133.561,44.45) IC4.U10@134.061,44.95
  TopLayer w0.2: TP23.1@73.261,63.3 OSC3.7@73.261,65.025 OSC3.7@73.261,65.172
  Layer 5 w0.1: v5(69.686,71.875) 73.911,71.875 76.666,69.12 76.666,62.36 79.111,59.915 79.111,51.764 78.797,51.449 v1@78.797,49.054
  Layer 6 w0.1: v1(78.811,49.075) 78.832,49.054 117.378,49.054 120.632,45.8 124.888,45.8 125.588,45.1 132.911,45.1 v1(133.561,44.45)
HV_REV0: IC4.N2 R165.1 R169.2 | length 25.8
  TopLayer w0.127: R165.1@124.621,73.175 124.621,72.01 124.375,71.764 124.359,71.764 124.115,71.519 124.115,49.946 124.561,49.5 125.511,49.5 IC4.N2@126.061,48.95
HV_REV1: IC4.N1 R164.1 R168.2 | length 25.3
  TopLayer w0.127: R168.2@123.621,71.99 123.395,71.764 123.348,71.764 123.122,71.537 123.122,67.639 123.786,66.975 123.786,49.85 124.621,49.016 124.996,49.016 IC4.N1@125.061,48.95 ; R168.2@123.621,72.19 R164.1@123.621,73.175
HV_REV2: IC4.P1 R163.1 R167.2 | length 26.4
  TopLayer w0.127: R167.2@122.621,71.99 122.395,71.764 122.362,71.764 122.148,71.549 122.148,67.438 122.988,66.598 122.988,50.023 IC4.P1@125.061,47.95 ; R167.2@122.621,72.19 R163.1@122.621,73.175
HV_REV3: IC4.R1 R162.1 R166.2 | length 28.4
  TopLayer w0.127: R166.2@121.621,71.99 121.395,71.764 121.34,71.764 120.936,71.359 120.936,67.35 122.661,65.625 122.661,48.725 124.436,46.95 IC4.R1@125.061,46.95 ; R166.2@121.621,72.19 R162.1@121.621,73.175
I2C_SW_RESET: IC4.U5 R33.2 T21.1 | length 78.2
  TopLayer w0.095: v1(128.561,45.45) IC4.U5@129.061,44.95
  TopLayer w0.1: R33.2@54.511,48.58 54.461,48.53 T21.1@54.461,47.2 55.045,47.2 55.32,47.475 v2(55.336,47.475)
  BottomLayer w0.095: v2(55.336,47.475) 56.126,46.685 60.083,46.685 61.348,47.95 114.366,47.95 115.451,46.865 127.146,46.865 v1(128.561,45.45)
I2C_SW_RESET2: IC18.27 R46.2 T22.1 | length 46.1
  TopLayer w0.125: v2(16.869,62.058) IC18.27@17.676,62.058
  TopLayer w0.15: v2(14.911,58.975) 15.37,58.516 22.861,58.516 22.866,58.511 23.218,58.511 23.224,58.516 24.918,58.516 27.186,56.248 27.677,55.757 29.959,53.475 50.806,53.475 R46.2@51.731,52.55 ; R46.2@51.731,52.53 52.636,51.625 52.736,51.625 52.961,51.4 T22.1@52.961,51.2
  Layer 3 w0.125: v2(14.911,58.975) 14.911,60.1 15.333,60.522 v2(16.869,62.058)
I2C_SW_RESET_N: IC15.24 R151.1 T21.3 T22.3 | length 17.6
  TopLayer w0.125: T22.3@52.011,48.9 52.636,48.9 53.623,47.913 53.623,44.913 53.511,44.8 53.611,44.7 55.236,44.7 55.886,45.35 v2(56.761,45.35) ; R151.1@56.736,46.055 56.761,46.03 v2(56.761,45.35) ; IC15.24@64.111,43.879 57.957,43.879 57.395,44.441 57.395,44.716 v2(56.761,45.35)
I2C_SW_SCL: IC4.AP10 IC15.19 IC22.3 R149.1 TP19.1 | length 123.8
  TopLayer w0.125: IC22.3@48.661,65.275 47.738,65.275 47.259,65.754 47.259,66.234 47.588,66.564 51.497,66.564 52.561,65.5 52.561,61.925 50.161,59.525 50.161,56.175 56.024,50.313 59.392,50.313 TP19.1@60.779,48.925 63.47,48.925 v2(65.216,47.178) 65.908,47.178 66.611,46.475 IC15.19@66.611,43.879 ; v2(125.386,26.791) 132.514,26.791 132.761,27.039 133.15,27.039 IC4.AP10@134.061,27.95
  layer 8 w0.125: v2(65.216,47.178) 68.189,44.206 68.189,44.122 71.161,41.15 71.161,36.475 83.111,24.525 113.746,24.525 116.012,26.791 v2(125.386,26.791)
I2C_SW_SDA: IC4.AP11 IC15.20 IC22.4 R148.1 TP18.1 | length 124.7
  TopLayer w0.125: IC22.4@48.661,65.925 48.716,65.98 51.356,65.98 52.211,65.125 52.211,62.225 49.701,59.715 49.701,55.985 56.736,48.95 57.629,48.95 TP18.1@57.629,48.925 58.202,48.353 58.227,48.353 58.832,47.747 63.014,47.747 v2(63.686,47.075) ; R148.1@63.531,46.341 63.686,46.496 v2(63.686,47.075) ; IC15.20@66.111,43.879 66.111,46.005 65.566,46.55 65.156,46.55 64.631,47.075 v2(63.686,47.075) ; v2(125.511,26.075) 131.744,26.075 132.061,26.392 132.821,26.392 133.154,26.725 133.315,26.725 134.079,27.489 134.6,27.489 IC4.AP11@135.061,27.95
  layer 8 w0.125: v2(63.686,47.075) 63.738,47.023 63.738,46.759 69.611,40.886 69.611,35 81.761,22.85 113.97,22.85 117.195,26.075 v2(125.511,26.075)
LED_ERR: IC4.U1 R23.2 T12.1 | length 127.7
  TopLayer w0.095: v1(124.561,45.45) IC4.U1@125.061,44.95
  Layer 6 w0.095: v2(4.111,49.3) 4.186,49.375 10.524,49.375 11.813,48.086 15.125,48.086 19.765,48.086 ccw(c19.861,48.625) 19.957,48.086 32.622,48.086 33.561,49.025 42.086,49.025 43.858,47.253 46.325,47.253 46.807,47.734 53.591,47.734 54.346,46.979 56.825,46.979 58.521,48.675 117.064,48.675 120.289,45.45 v1(124.561,45.45)
  BottomLayer w0.125: T12.1@1.794,49.42 R23.2@3.024,49.42 ; R23.2@3.069,49.375 3.934,49.375 4.009,49.3 v2(4.111,49.3)
LED_USER0: IC4.R8 R45.2 T3.1 | length 157.8
  TopLayer w0.095: v1(131.561,47.45) IC4.R8@132.061,46.95
  Layer 5 w0.127: v5(34.711,43.25) 36.411,44.95 37.261,44.95 38.361,46.05 39.961,46.05 43.261,49.35 45.949,49.35 47.43,50.832 ; 47.436,50.85 47.436,67.5 55.136,75.2 79.361,75.2 v5(84.061,79.9)
  layer 8 w0.095: v5(84.061,79.9) 102.949,79.9 104.718,78.13 104.718,59.743 110.248,54.213 116.682,54.213 122.994,47.9 125.806,47.9 126.708,46.998 129.858,46.998 130.31,47.45 v1(131.561,47.45)
  BottomLayer w0.127: T3.1@27.524,37.76 27.523,37.96 27.76,38.196 27.787,38.196 28.003,38.413 28.003,40.334 30.286,42.617 34.078,42.617 v5(34.711,43.25)
LED_USER1: IC4.P8 R227.2 T19.1 | length 182.1
  TopLayer w0.095: v1(131.561,48.45) IC4.P8@132.061,47.95
  Layer 5 w0.1: v2(5.602,40.515) 5.71,40.515 5.843,40.381 7.807,40.381 11.376,43.95 16.536,43.95 20.761,48.175 32.761,48.175 34.136,49.55 41.986,49.55 46.686,54.25 46.686,68.75 54.161,76.225 78.411,76.225 82.861,80.675 v5(84.136,80.675)
  layer 8 w0.095: v5(84.136,80.675) 102.749,80.675 105.125,78.299 105.125,59.911 110.561,54.475 117.039,54.475 122.698,48.817 124.174,48.817 124.89,48.1 126.286,48.1 126.586,47.8 130.911,47.8 v1(131.561,48.45)
  BottomLayer w0.1: T19.1@0.712,40 R227.2@2.236,40 ; R227.2@2.236,39.995 2.256,39.995 2.496,40.235 2.496,40.255 3.211,40.97 5.129,40.97 5.585,40.515 v2(5.602,40.515)
LED_USER2: IC4.U6 R19.2 T2.1 | length 133.1
  TopLayer w0.095: v1(129.561,45.45) IC4.U6@130.061,44.95
  Layer 6 w0.095: v2(1.976,46.082) 25.218,46.082 25.983,46.848 36.263,46.848 36.488,46.623 57.332,46.623 v1(58.044,47.334)
  BottomLayer w0.095: T2.1@0.764,45.112 1.966,45.112 R19.2@1.974,45.104 ; R19.2@1.976,45.102 v2(1.976,46.082) ; v1(58.044,47.334) 58.049,47.334 58.076,47.306 60.428,47.306 61.849,48.728 110.655,48.728 110.932,48.45 115.089,48.45 116.479,47.06 127.442,47.06 129.052,45.45 v1(129.561,45.45)
Main_DCXO_C_N: C189.1 OSC1.5 R304.2 | length 3.5
  TopLayer w0.095: C189.1@59.814,68.929 59.839,68.929 59.992,69.081 59.992,69.137 60.048,69.193 60.311,69.193 60.32,69.202 60.426,69.202 60.482,69.146 60.482,69.028 R304.2@60.715,68.795 60.95,69.03 61.231,69.03 62.211,68.05 OSC1.5@62.386,68.05 ; OSC1.5@62.411,68.025 OSC1.5@62.386,68.05 ; OSC1.5@62.411,68.05 OSC1.5@62.386,68.05
Main_DCXO_C_P: C188.1 OSC1.4 R305.2 | length 3.5
  TopLayer w0.095: C188.1@59.814,69.679 59.839,69.679 59.992,69.526 59.992,69.47 60.048,69.415 60.219,69.415 60.228,69.424 60.43,69.424 60.486,69.479 60.486,69.592 R305.2@60.721,69.828 60.95,69.598 61.219,69.598 62.211,70.59 OSC1.4@62.411,70.59
Main_DCXO_N: C189.2 IC1.20 R12.2 | length 42.1
  TopLayer w0.095: v1(28.886,59.928) 29.184,59.928 29.192,59.936 29.24,59.936 29.482,60.178 R12.2@29.502,60.178 R12.2@29.719,59.962 ; v1(58.347,69.013) 58.416,69.013 58.605,69.202 58.872,69.202 58.937,69.137 58.937,69.081 59.089,68.929 C189.2@59.114,68.929
  layer 8 w0.075: v1(28.886,59.928) 28.854,59.928 28.705,59.779 28.357,59.779 28.186,59.95 28.186,60.537 29.32,61.671 37.965,61.671 38.536,61.1 39.332,60.304 50.176,60.304 53.263,63.391 53.263,67.876 54.599,69.212 58.148,69.212 v1(58.347,69.013)
  BottomLayer w0.095: v1(28.886,59.928) cw(c28.886,59.821) 28.961,59.897 29,59.858 ccw(c29.167,60.026) 29.167,59.789 29.38,59.789 ccw(c29.38,60.026) 29.547,59.858 cw(c29.715,59.691) 29.715,59.928 IC1.20@29.911,59.928
Main_DCXO_OE: IC12.8 IC24.28 IC28.11 R244.1 R246.2 | length 67.8
  TopLayer w0.125: v2(57.736,51.449) 70.13,51.449 74.232,55.551 R244.1@74.231,57.55 R244.1@74.231,57.55 74.458,57.777 74.458,58.135 74.586,58.262 IC12.8@74.586,58.85
  Layer 5 w0.125: v2(57.736,51.449) 58.74,51.449 62.083,48.106 62.083,28.957 66.161,24.879 v1(66.161,21.159)
  BottomLayer w0.125: v1(66.161,21.159) 66.161,19.613 66.048,19.501 66.048,17.973 67.886,16.136 IC28.11@67.886,12.825 ; IC28.11@67.975,12.736 67.975,11.986 68.536,11.425 IC24.28@68.536,10.35
Main_DCXO_P: C188.2 IC1.19 R12.1 | length 42.5
  TopLayer w0.095: v1(28.886,59.428) 28.9,59.442 29.299,59.442 R12.1@29.502,59.238 ; v1(58.347,69.613) 58.416,69.613 58.605,69.424 58.881,69.424 58.937,69.48 58.937,69.526 59.089,69.679 C188.2@59.114,69.679
  layer 8 w0.075: v1(28.886,59.428) 28.854,59.428 28.705,59.577 28.273,59.577 27.984,59.866 27.984,60.62 29.237,61.873 38.049,61.873 38.822,61.1 39.439,60.483 50.069,60.483 53.061,63.475 53.061,67.96 54.515,69.414 58.148,69.414 v1(58.347,69.613)
  BottomLayer w0.095: v1(28.886,59.428) ccw(c28.886,59.535) 28.961,59.459 29,59.497 cw(c29.167,59.33) 29.167,59.567 29.38,59.567 cw(c29.38,59.33) 29.547,59.497 ccw(c29.715,59.665) 29.715,59.428 IC1.19@29.911,59.428
Main_DCXO_SCL: IC4.R2 OSC1.8 R35.1 TP22.1 | length 81.9
  TopLayer w0.095: v1(125.561,47.45) IC4.R2@126.061,46.95
  TopLayer w0.1: OSC1.8@64.511,70.877 OSC1.8@64.511,71.075 TP22.1@64.511,72.8 TP22.1@64.541,72.83 ; R35.1@66.961,72.83 TP22.1@64.541,72.83 ; v2(81.786,63.425) 81.226,63.425 80.136,64.515 80.136,69.636 74.227,75.545 67.256,75.545 TP22.1@64.541,72.83
  layer 8 w0.095: v2(81.786,63.425) 85.336,63.425 88.036,60.725 96.836,60.725 104.399,53.162 116.419,53.162 122.131,47.45 v1(125.561,47.45)
Main_DCXO_SDA: IC4.T7 OSC1.7 R34.1 TP21.1 | length 96.3
  TopLayer w0.095: v1(130.561,46.45) IC4.T7@131.061,45.95
  TopLayer w0.1: OSC1.7@64.511,65.172 64.511,69.225 65.264,69.978 65.264,71.467 66.097,72.3 67.411,72.3 67.867,72.756 67.937,72.756 R34.1@68.011,72.83 68.031,72.83 68.886,73.685 68.886,74.55 69.336,75 73.786,75 79.636,69.15 79.636,63.425 81.936,61.125 81.936,60.8 v5(82.011,60.725)
  TopLayer w0.2: TP21.1@64.511,63.3 OSC1.7@64.511,65.025 OSC1.7@64.511,65.172
  Layer 5 w0.095: v5(82.011,60.725) 82.011,53.146 v1(84.332,50.825)
  Layer 6 w0.095: v1(84.332,50.825) 84.909,50.248 118.213,50.248 121.04,47.421 124.69,47.421 125.204,46.908 130.103,46.908 v1(130.561,46.45)
MGT1_RxC_N: C450.1 J14.E5 | length 41.6
  BottomLayer w0.095: C450.1@177.786,21.775 177.811,21.775 177.964,21.927 177.964,21.971 178.019,22.026 179.81,22.026 ccw(c179.81,22.835) 180.382,22.263 180.447,22.328 cw(c180.861,21.914) 180.861,22.5 184.158,22.5 cw(c184.158,20.215) 185.774,21.831 189.908,17.697 cw(c188.112,15.901) 190.652,15.901 190.652,13.614 ccw(c193.414,13.614) 191.461,11.661 194.463,8.659 ccw(c196.416,10.612) 196.416,7.85 209.489,7.85 cw(c209.489,7.55) 209.789,7.55 cw(c209.35,7.55) 209.66,7.24 209.491,7.071 cw(c209.2,7.362) J14.E5@209.2,6.95
MGT1_RxC_P: C449.1 J14.D5 | length 41.9
  BottomLayer w0.095: C449.1@177.786,22.5 177.811,22.5 177.964,22.347 177.964,22.304 178.019,22.248 179.718,22.248 ccw(c179.718,23.057) 180.29,22.485 cw(c180.861,21.914) 180.861,22.722 184.158,22.722 cw(c184.158,20.215) 185.931,21.988 186.479,21.44 190.065,17.854 cw(c188.112,15.901) 190.874,15.901 190.874,13.614 ccw(c193.414,13.614) 191.618,11.818 194.62,8.816 ccw(c196.416,10.612) 196.416,8.072 209.489,8.072 cw(c209.489,7.55) 210.011,7.55 ccw(c210.449,7.55) 210.139,7.24 210.308,7.071 ccw(c210.6,7.362) J14.D5@210.6,6.95
MGT1_Tx_N: C70.2 J14.B5 | length 44.5
  TopLayer w0.095: C70.2@177.786,21.775 177.811,21.775 177.964,21.927 177.964,21.971 178.019,22.026 180.361,22.026 180.376,22.041 185.034,22.041 cw(c185.034,19.681) 186.702,21.35 187.837,20.216 cw(c186.349,18.728) 188.453,18.728 188.453,17.944 ccw(c191.215,17.944) 189.262,15.991 196.594,8.659 ccw(c198.547,10.612) 198.547,7.85 203.361,7.85 213.789,7.85 cw(c213.789,7.65) 213.989,7.65 cw(c213.4,7.65) 213.451,7.063 213.428,7.04 213.4,7.012 J14.B5@213.4,6.95
MGT1_Tx_P: C63.2 J14.A5 | length 44.9
  TopLayer w0.095: C63.2@177.786,22.5 177.811,22.5 177.964,22.347 177.964,22.304 178.019,22.248 180.269,22.248 180.284,22.263 185.126,22.263 cw(c185.126,19.903) 186.794,21.572 187.994,20.373 cw(c186.349,18.728) 188.675,18.728 188.675,17.944 ccw(c191.215,17.944) 189.419,16.148 196.751,8.816 ccw(c198.547,10.612) 198.547,8.072 203.361,8.072 213.789,8.072 cw(c213.789,7.65) 214.211,7.65 ccw(c214.8,7.65) 214.748,7.063 214.772,7.04 214.8,7.012 J14.A5@214.8,6.95
MGT2_RxC_N: C411.1 J33.E3 | length 36
  BottomLayer w0.095: C411.1@177.786,23.975 ccw(c177.786,24.035) 177.829,23.993 177.953,24.117 ccw(c177.926,24.143) 177.964,24.143 cw(c178.001,24.143) 177.974,24.169 cw(c178.082,24.061) 178.082,24.214 185.031,24.214 cw(c185.031,21.674) 186.827,23.47 190.404,19.893 191.542,18.756 192.639,17.659 ccw(c194.59,19.61) 192.641,17.656 ccw(c194.59,19.61) 194.587,16.85 ccw(c194.59,19.61) 194.59,16.85 209.489,16.85 cw(c209.489,16.55) 209.789,16.55 cw(c209.35,16.55) 209.66,16.24 209.491,16.071 cw(c209.2,16.362) J33.E3@209.2,15.95
MGT2_RxC_P: C410.1 J33.D3 | length 36.4
  BottomLayer w0.095: C410.1@177.786,24.675 cw(c177.786,24.615) 177.829,24.657 177.953,24.533 cw(c177.926,24.507) 177.964,24.507 ccw(c178.001,24.507) 177.974,24.481 ccw(c178.082,24.589) 178.082,24.436 185.033,24.436 cw(c185.033,21.68) 186.982,23.629 190.404,20.207 192.795,17.816 ccw(c194.591,19.612) 194.591,17.072 209.489,17.072 cw(c209.489,16.55) 210.011,16.55 ccw(c210.449,16.55) 210.139,16.24 210.308,16.071 ccw(c210.6,16.362) J33.D3@210.6,15.95
MGT2_Tx_N: C72.2 J33.B3 | length 40.3
  TopLayer w0.095: C72.2@177.786,23.975 ccw(c177.786,24.035) 177.829,23.993 177.953,24.117 ccw(c177.926,24.143) 177.964,24.143 cw(c178.001,24.143) 177.974,24.169 cw(c178.082,24.061) 178.082,24.214 185.145,24.214 cw(c185.145,21.674) 186.941,23.47 192.753,17.658 ; 192.753,17.658 ccw(c194.704,19.609) 194.703,16.85 ; 194.704,16.85 199.961,16.85 213.789,16.85 cw(c213.789,16.65) 213.989,16.65 cw(c213.4,16.65) 213.451,16.063 213.428,16.04 213.4,16.012 J33.B3@213.4,15.95
MGT2_Tx_P: C71.2 J33.A3 | length 40.6
  TopLayer w0.095: C71.2@177.786,24.675 cw(c177.786,24.615) 177.829,24.657 177.953,24.533 cw(c177.926,24.507) 177.964,24.507 ccw(c178.001,24.507) 177.974,24.481 ccw(c178.082,24.589) 178.082,24.436 185.147,24.436 cw(c185.147,21.68) 187.096,23.629 192.909,17.816 ccw(c194.705,19.612) 194.705,17.072 199.391,17.072 199.961,17.072 213.789,17.072 cw(c213.789,16.65) 214.211,16.65 ccw(c214.8,16.65) 214.748,16.063 214.772,16.04 214.8,16.012 J33.A3@214.8,15.95
MGT3_RxC_N: C437.1 J12.E1 | length 51.4
  BottomLayer w0.095: C437.1@177.786,25.975 ccw(c177.786,26.035) 177.829,25.993 177.948,26.112 ccw(c177.911,26.149) 177.964,26.149 cw(c178.016,26.149) 177.979,26.186 cw(c178.076,26.089) 178.076,26.226 184.908,26.226 ccw(c184.908,28.986) 186.86,27.035 188.853,29.028 ccw(c186.902,30.979) 189.661,30.979 189.661,45.31 cw(c192.201,45.31) 192.201,47.85 209.489,47.85 cw(c209.489,47.55) 209.789,47.55 cw(c209.35,47.55) 209.66,47.24 209.491,47.071 cw(c209.2,47.362) J12.E1@209.2,46.95
MGT3_RxC_P: C258.1 J12.D1 | length 51.7
  BottomLayer w0.095: C258.1@177.786,26.7 cw(c177.786,26.64) 177.829,26.682 177.948,26.563 cw(c177.911,26.526) 177.964,26.526 ccw(c178.016,26.526) 177.979,26.489 ccw(c178.076,26.586) 178.076,26.448 184.907,26.448 ccw(c184.907,28.988) 186.703,27.192 188.695,29.184 ccw(c186.899,30.98) 189.439,30.98 189.439,45.31 cw(c192.201,45.31) 192.201,48.072 209.489,48.072 cw(c209.489,47.55) 210.011,47.55 ccw(c210.449,47.55) 210.139,47.24 210.308,47.071 ccw(c210.6,47.362) J12.D1@210.6,46.95
MGT3_Tx_N: C230.2 J12.B1 | length 51.8
  TopLayer w0.095: C230.2@177.786,25.975 ccw(c177.786,26.035) 177.829,25.993 177.948,26.112 ccw(c177.911,26.149) 177.964,26.149 cw(c178.016,26.149) 177.979,26.186 cw(c178.076,26.089) 178.076,26.227 184.308,26.227 ccw(c184.308,28.986) 186.26,27.035 188.453,29.228 ccw(c186.502,31.179) 189.261,31.179 189.261,38.898 cw(c191.801,38.898) 190.005,40.694 196.417,47.106 cw(c198.213,45.31) 198.213,47.85 213.789,47.85 cw(c213.789,47.65) 213.989,47.65 cw(c213.4,47.65) 213.451,47.063 213.428,47.04 213.4,47.012 J12.B1@213.4,46.95
MGT3_Tx_P: C73.2 J12.A1 | length 52.1
  TopLayer w0.095: C73.2@177.786,26.7 cw(c177.786,26.64) 177.829,26.682 177.948,26.563 cw(c177.911,26.526) 177.964,26.526 ccw(c178.016,26.526) 177.979,26.489 ccw(c178.076,26.586) 178.076,26.449 184.307,26.449 ccw(c184.307,28.989) 186.103,27.192 188.295,29.384 ccw(c186.499,31.18) 189.039,31.18 189.039,38.899 cw(c191.798,38.899) 189.847,40.85 196.261,47.264 cw(c198.212,45.313) 198.212,48.072 213.789,48.072 cw(c213.789,47.65) 214.211,47.65 ccw(c214.8,47.65) 214.748,47.063 214.772,47.04 214.8,47.012 J12.A1@214.8,46.95
MGT4_RxC_N: C438.1 J12.E3 | length 53.1
  BottomLayer w0.095: C438.1@177.786,27.875 ccw(c177.786,27.935) 177.829,27.893 177.944,28.008 ccw(c177.896,28.055) 177.964,28.055 cw(c178.031,28.055) 177.983,28.103 cw(c178.07,28.016) 178.07,28.139 182.239,28.139 ccw(c182.239,30.855) 184.16,28.935 186.753,31.528 ccw(c184.802,33.479) 187.561,33.479 187.561,49.31 cw(c190.101,49.31) 190.101,51.85 209.489,51.85 cw(c209.489,51.55) 209.789,51.55 cw(c209.35,51.55) 209.66,51.24 209.491,51.071 cw(c209.2,51.362) J12.E3@209.2,50.95
MGT4_RxC_P: C434.1 J12.D3 | length 53.5
  BottomLayer w0.095: C434.1@177.786,28.625 cw(c177.786,28.565) 177.829,28.607 177.944,28.492 cw(c177.896,28.445) 177.964,28.445 ccw(c178.031,28.445) 177.983,28.397 ccw(c178.07,28.484) 178.07,28.361 182.235,28.361 ccw(c182.235,30.863) 184.005,29.094 186.595,31.684 ccw(c184.799,33.48) 187.339,33.48 187.339,49.31 cw(c190.101,49.31) 190.101,52.072 209.489,52.072 cw(c209.489,51.55) 210.011,51.55 ccw(c210.449,51.55) 210.139,51.24 210.308,51.071 ccw(c210.6,51.362) J12.D3@210.6,50.95
MGT4_Tx_N: C231.2 J12.B3 | length 53.3
  TopLayer w0.095: C231.2@177.786,27.875 ccw(c177.786,27.935) 177.829,27.893 177.944,28.008 ccw(c177.896,28.055) 177.964,28.055 cw(c178.031,28.055) 177.983,28.103 cw(c178.07,28.016) 178.07,28.139 183.321,28.139 ccw(c183.321,30.898) 185.272,28.947 186.853,30.528 ccw(c184.902,32.479) 187.661,32.479 187.661,41.294 cw(c190.201,41.294) 188.405,43.09 196.421,51.106 cw(c198.217,49.31) 198.217,51.85 213.789,51.85 cw(c213.789,51.65) 213.989,51.65 cw(c213.4,51.65) 213.451,51.063 213.428,51.04 213.4,51.012 J12.B3@213.4,50.95
MGT4_Tx_P: C74.2 J12.A3 | length 53.6
  TopLayer w0.095: C74.2@177.786,28.625 cw(c177.786,28.565) 177.829,28.607 177.944,28.492 cw(c177.896,28.445) 177.964,28.445 ccw(c178.031,28.445) 177.983,28.397 ccw(c178.07,28.484) 178.07,28.361 183.32,28.361 ccw(c183.32,30.901) 185.116,29.105 186.695,30.684 ccw(c184.899,32.48) 187.439,32.48 187.439,41.295 cw(c190.198,41.295) 188.247,43.246 196.265,51.264 cw(c198.216,49.313) 198.216,52.072 213.789,52.072 cw(c213.789,51.65) 214.211,51.65 ccw(c214.8,51.65) 214.748,51.063 214.772,51.04 214.8,51.012 J12.A3@214.8,50.95
MGT5_RxC_N: C439.1 J12.E5 | length 33.7
  BottomLayer w0.095: C439.1@177.786,55.8 177.811,55.8 177.964,55.648 ccw(c178.059,55.647) 177.991,55.58 ccw(c178.059,55.647) 178.059,55.552 190.462,55.552 cw(c190.462,54.38) 191.291,55.209 191.706,54.794 ccw(c193.502,56.59) 193.502,54.05 209.489,54.05 ccw(c209.489,54.35) 209.789,54.35 ccw(c209.35,54.35) 209.66,54.66 209.491,54.829 ccw(c209.2,54.538) J12.E5@209.2,54.95
MGT5_RxC_P: C435.1 J12.D5 | length 34
  BottomLayer w0.095: C435.1@177.786,55.083 ccw(c177.786,55.143) 177.829,55.1 C435.1@177.95,55.221 ; C435.1@177.95,55.221 ccw(c177.916,55.255) 177.964,55.255 cw(c178.011,55.255) 177.978,55.289 cw(c178.078,55.188) 178.078,55.33 190.459,55.33 cw(c190.459,54.373) 191.136,55.05 191.549,54.637 ccw(c193.501,56.588) 193.501,53.828 195.719,53.828 209.489,53.828 ccw(c209.489,54.35) 210.011,54.35 cw(c210.449,54.35) 210.139,54.66 210.308,54.829 cw(c210.6,54.538) J12.D5@210.6,54.95
MGT5_Tx_N: C232.2 J12.B5 | length 37.8
  TopLayer w0.095: C232.2@177.786,55.8 cw(c177.786,55.74) 177.829,55.782 177.95,55.661 cw(c177.916,55.628) 177.964,55.628 ccw(c178.011,55.628) 177.978,55.594 ccw(c178.078,55.695) 178.078,55.552 186.801,55.552 cw(c186.801,53.267) 188.417,54.883 188.506,54.794 ccw(c190.302,56.59) 190.302,54.05 213.797,54.05 ccw(c213.797,54.242) 213.989,54.242 ccw(c213.701,54.242) 213.905,54.445 J12.B5@213.4,54.95